# Altium PCB PCB_Lora(long-range)-board_2026-11-07.pcbdoc (part 2 of 2)
Units mil, origin at the board's own origin, x right, y up, seen from the top; angles counter-clockwise.
Board outline 3860 x 3395 mil, 2 copper layers (Top Layer, Bottom Layer); 64 components, 85 nets, 224 pads, 399 vias.
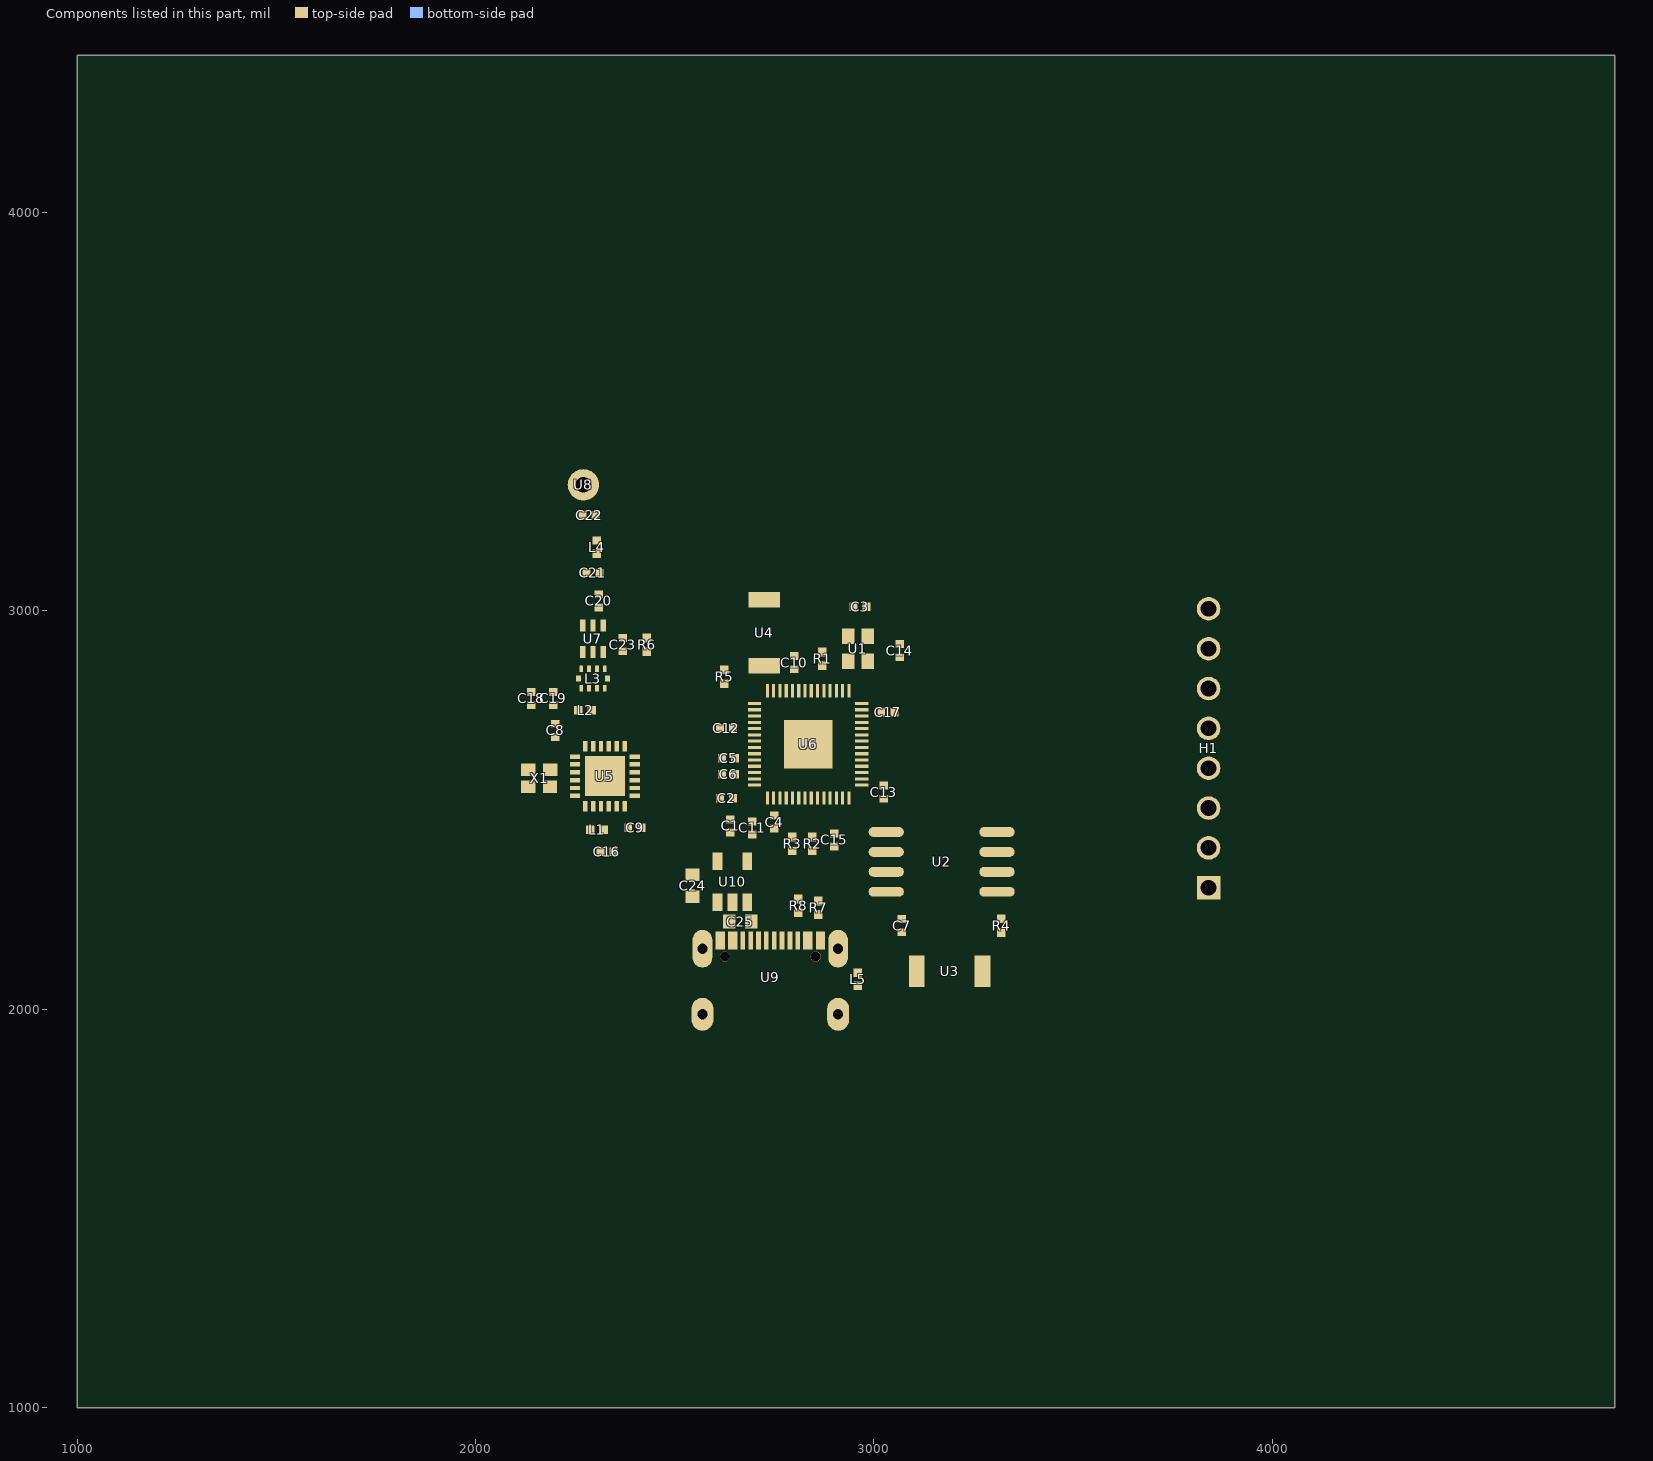
[diagram p2: the components of this part, seen from the top]

## Polygon pours and split planes (outlines as drawn) (continued)
VCC on Internal Plane 2 (split plane): 96 vertices, not listed, extent 2351.72,2801.71 2388.29,2838.29
VCC on Internal Plane 2 (split plane): 350 vertices, not listed, extent 2126.72,2811.71 2248.29,2878.29
VCC on Internal Plane 2 (split plane): 96 vertices, not listed, extent 2081.72,2821.71 2118.29,2858.29
VCC on Internal Plane 2 (split plane): 96 vertices, not listed, extent 3671.72,2826.71 3708.29,2863.29
VCC on Internal Plane 2 (split plane): 96 vertices, not listed, extent 2401.72,2826.71 2438.29,2863.29
VCC on Internal Plane 2 (split plane): 96 vertices, not listed, extent 1961.72,2831.71 1998.29,2868.29
VCC on Internal Plane 2 (split plane): 96 vertices, not listed, extent 3541.72,2846.71 3578.29,2883.29
VCC on Internal Plane 2 (split plane): 96 vertices, not listed, extent 3436.72,2856.71 3473.29,2893.29
VCC on Internal Plane 2 (split plane): 96 vertices, not listed, extent 2471.72,2866.71 2508.29,2903.29
VCC on Internal Plane 2 (split plane): 133 vertices, not listed, extent 3804.39,2869.39 3875.61,2940.61
VCC on Internal Plane 2 (split plane): 96 vertices, not listed, extent 2216.72,2871.71 2253.29,2908.29
VCC on Internal Plane 2 (split plane): 188 vertices, not listed, extent 2176.72,2876.71 2223.29,2948.29
VCC on Internal Plane 2 (split plane): 96 vertices, not listed, extent 1961.72,2881.71 1998.29,2918.29
VCC on Internal Plane 2 (split plane): 96 vertices, not listed, extent 2746.72,2881.71 2783.29,2918.29
VCC on Internal Plane 2 (split plane): 96 vertices, not listed, extent 3261.72,2886.71 3298.29,2923.29
VCC on Internal Plane 2 (split plane): 96 vertices, not listed, extent 3736.72,2886.71 3773.29,2923.29
VCC on Internal Plane 2 (split plane): 96 vertices, not listed, extent 2596.72,2896.71 2633.29,2933.29
VCC on Internal Plane 2 (split plane): 96 vertices, not listed, extent 2101.72,2906.71 2138.29,2943.29
VCC on Internal Plane 2 (split plane): 96 vertices, not listed, extent 2481.72,2906.71 2518.29,2943.29
VCC on Internal Plane 2 (split plane): 96 vertices, not listed, extent 3601.72,2911.71 3638.29,2948.29
VCC on Internal Plane 2 (split plane): 96 vertices, not listed, extent 2146.72,2911.71 2183.29,2948.29
VCC on Internal Plane 2 (split plane): 96 vertices, not listed, extent 3161.72,2931.71 3198.29,2968.29
VCC on Internal Plane 2 (split plane): 96 vertices, not listed, extent 2531.72,2936.71 2568.29,2973.29
VCC on Internal Plane 2 (split plane): 96 vertices, not listed, extent 2736.72,2941.71 2773.29,2978.29
VCC on Internal Plane 2 (split plane): 96 vertices, not listed, extent 1961.72,2946.71 1998.29,2983.29
VCC on Internal Plane 2 (split plane): 96 vertices, not listed, extent 3396.72,2946.71 3433.29,2983.29
VCC on Internal Plane 2 (split plane): 96 vertices, not listed, extent 2461.72,2946.71 2498.29,2983.29
VCC on Internal Plane 2 (split plane): 96 vertices, not listed, extent 2171.72,2951.71 2208.29,2988.29
VCC on Internal Plane 2 (split plane): 96 vertices, not listed, extent 3286.72,2956.71 3323.29,2993.29
VCC on Internal Plane 2 (split plane): 96 vertices, not listed, extent 3626.72,2956.71 3663.29,2993.29
VCC on Internal Plane 2 (split plane): 96 vertices, not listed, extent 2416.72,2956.71 2453.29,2993.29
VCC on Internal Plane 2 (split plane): 96 vertices, not listed, extent 3021.72,2956.71 3058.29,2993.29
VCC on Internal Plane 2 (split plane): 96 vertices, not listed, extent 2056.72,2961.71 2093.29,2998.29
VCC on Internal Plane 2 (split plane): 96 vertices, not listed, extent 3531.72,2971.71 3568.29,3008.29
VCC on Internal Plane 2 (split plane): 20 vertices, not listed, extent 3854.76,2972.59 3872.41,2990.24
VCC on Internal Plane 2 (split plane): 20 vertices, not listed, extent 3807.59,2972.59 3825.24,2990.24
VCC on Internal Plane 2 (split plane): 96 vertices, not listed, extent 2856.72,2976.71 2893.29,3013.29
VCC on Internal Plane 2 (split plane): 96 vertices, not listed, extent 2226.72,2986.71 2263.29,3023.29
VCC on Internal Plane 2 (split plane): 96 vertices, not listed, extent 2341.72,2986.71 2378.29,3023.29
VCC on Internal Plane 2 (split plane): 96 vertices, not listed, extent 1961.72,2996.71 1998.29,3033.29
VCC on Internal Plane 2 (split plane): 20 vertices, not listed, extent 3854.76,3019.76 3872.41,3037.41
VCC on Internal Plane 2 (split plane): 20 vertices, not listed, extent 3807.59,3019.76 3825.24,3037.41
VCC on Internal Plane 2 (split plane): 96 vertices, not listed, extent 2181.72,3026.71 2218.29,3063.29
VCC on Internal Plane 2 (split plane): 96 vertices, not listed, extent 2221.72,3026.71 2258.29,3063.29
VCC on Internal Plane 2 (split plane): 96 vertices, not listed, extent 3391.72,3036.71 3428.29,3073.29
VCC on Internal Plane 2 (split plane): 96 vertices, not listed, extent 2341.72,3036.71 2378.29,3073.29
VCC on Internal Plane 2 (split plane): 96 vertices, not listed, extent 3156.72,3046.71 3193.29,3083.29
VCC on Internal Plane 2 (split plane): 96 vertices, not listed, extent 3291.72,3046.71 3328.29,3083.29
VCC on Internal Plane 2 (split plane): 96 vertices, not listed, extent 3046.72,3051.71 3083.29,3088.29
VCC on Internal Plane 2 (split plane): 96 vertices, not listed, extent 1961.72,3051.71 1998.29,3088.29
VCC on Internal Plane 2 (split plane): 96 vertices, not listed, extent 2086.72,3056.71 2123.29,3093.29
VCC on Internal Plane 2 (split plane): 96 vertices, not listed, extent 3676.72,3061.71 3713.29,3098.29
VCC on Internal Plane 2 (split plane): 96 vertices, not listed, extent 2776.72,3066.71 2813.29,3103.29
VCC on Internal Plane 2 (split plane): 96 vertices, not listed, extent 2221.72,3076.71 2258.29,3113.29
VCC on Internal Plane 2 (split plane): 96 vertices, not listed, extent 3516.72,3086.71 3553.29,3123.29
VCC on Internal Plane 2 (split plane): 96 vertices, not listed, extent 3826.72,3091.71 3863.29,3128.29
VCC on Internal Plane 2 (split plane): 96 vertices, not listed, extent 2336.72,3091.71 2373.29,3128.29
VCC on Internal Plane 2 (split plane): 96 vertices, not listed, extent 1961.72,3101.71 1998.29,3138.29
VCC on Internal Plane 2 (split plane): 96 vertices, not listed, extent 2041.72,3101.71 2078.29,3138.29
VCC on Internal Plane 2 (split plane): 96 vertices, not listed, extent 2651.72,3101.71 2688.29,3138.29
VCC on Internal Plane 2 (split plane): 96 vertices, not listed, extent 2186.72,3106.71 2223.29,3143.29
VCC on Internal Plane 2 (split plane): 96 vertices, not listed, extent 2781.72,3116.71 2818.29,3153.29
VCC on Internal Plane 2 (split plane): 96 vertices, not listed, extent 2431.72,3131.71 2468.29,3168.29
VCC on Internal Plane 2 (split plane): 96 vertices, not listed, extent 3056.72,3136.71 3093.29,3173.29
VCC on Internal Plane 2 (split plane): 96 vertices, not listed, extent 2336.72,3136.71 2373.29,3173.29
VCC on Internal Plane 2 (split plane): 96 vertices, not listed, extent 2216.72,3141.71 2253.29,3178.29
VCC on Internal Plane 2 (split plane): 96 vertices, not listed, extent 1961.72,3156.71 1998.29,3193.29
VCC on Internal Plane 2 (split plane): 96 vertices, not listed, extent 3831.72,3156.71 3868.29,3193.29
VCC on Internal Plane 2 (split plane): 96 vertices, not listed, extent 2066.72,3161.71 2103.29,3198.29
VCC on Internal Plane 2 (split plane): 96 vertices, not listed, extent 2521.72,3161.71 2558.29,3198.29
VCC on Internal Plane 2 (split plane): 96 vertices, not listed, extent 3186.72,3166.71 3223.29,3203.29
VCC on Internal Plane 2 (split plane): 96 vertices, not listed, extent 3426.72,3166.71 3463.29,3203.29
VCC on Internal Plane 2 (split plane): 96 vertices, not listed, extent 3771.72,3171.71 3808.29,3208.29
VCC on Internal Plane 2 (split plane): 96 vertices, not listed, extent 3296.72,3181.71 3333.29,3218.29
VCC on Internal Plane 2 (split plane): 96 vertices, not listed, extent 2331.72,3181.71 2368.29,3218.29
VCC on Internal Plane 2 (split plane): 96 vertices, not listed, extent 2131.72,3191.71 2168.29,3228.29
VCC on Internal Plane 2 (split plane): 96 vertices, not listed, extent 2211.72,3191.71 2248.29,3228.29
VCC on Internal Plane 2 (split plane): 96 vertices, not listed, extent 2671.72,3196.71 2708.29,3233.29
VCC on Internal Plane 2 (split plane): 96 vertices, not listed, extent 2401.72,3201.71 2438.29,3238.29
VCC on Internal Plane 2 (split plane): 96 vertices, not listed, extent 1961.72,3206.71 1998.29,3243.29
VCC on Internal Plane 2 (split plane): 96 vertices, not listed, extent 2891.72,3211.71 2928.29,3248.29
VCC on Internal Plane 2 (split plane): 188 vertices, not listed, extent 2186.72,3226.71 2233.29,3298.29
VCC on Internal Plane 2 (split plane): 96 vertices, not listed, extent 3601.72,3231.71 3638.29,3268.29
VCC on Internal Plane 2 (split plane): 96 vertices, not listed, extent 3826.72,3236.71 3863.29,3273.29
VCC on Internal Plane 2 (split plane): 96 vertices, not listed, extent 2336.72,3236.71 2373.29,3273.29
VCC on Internal Plane 2 (split plane): 96 vertices, not listed, extent 2591.72,3246.71 2628.29,3283.29
VCC on Internal Plane 2 (split plane): 96 vertices, not listed, extent 1961.72,3251.71 1998.29,3288.29
VCC on Internal Plane 2 (split plane): 96 vertices, not listed, extent 2106.72,3256.71 2143.29,3293.29
VCC on Internal Plane 2 (split plane): 96 vertices, not listed, extent 3096.72,3261.71 3133.29,3298.29
VCC on Internal Plane 2 (split plane): 150 vertices, not listed, extent 2225.47,3270.89 2316.36,3361.79
VCC on Internal Plane 2 (split plane): 96 vertices, not listed, extent 2331.72,3276.71 2368.29,3313.29
VCC on Internal Plane 2 (split plane): 96 vertices, not listed, extent 3826.72,3281.71 3863.29,3318.29
VCC on Internal Plane 2 (split plane): 96 vertices, not listed, extent 2796.72,3286.71 2833.29,3323.29
VCC on Internal Plane 2 (split plane): 96 vertices, not listed, extent 1961.72,3291.71 1998.29,3328.29
VCC on Internal Plane 2 (split plane): 96 vertices, not listed, extent 2061.72,3291.71 2098.29,3328.29
VCC on Internal Plane 2 (split plane): 96 vertices, not listed, extent 3491.72,3296.71 3528.29,3333.29
VCC on Internal Plane 2 (split plane): 96 vertices, not listed, extent 2466.72,3301.71 2503.29,3338.29
VCC on Internal Plane 2 (split plane): 96 vertices, not listed, extent 2186.72,3311.71 2223.29,3348.29
VCC on Internal Plane 2 (split plane): 96 vertices, not listed, extent 2331.72,3316.71 2368.29,3353.29
VCC on Internal Plane 2 (split plane): 96 vertices, not listed, extent 2696.72,3321.71 2733.29,3358.29
VCC on Internal Plane 2 (split plane): 96 vertices, not listed, extent 3826.72,3331.71 3863.29,3368.29
VCC on Internal Plane 2 (split plane): 96 vertices, not listed, extent 3301.72,3331.71 3338.29,3368.29
VCC on Internal Plane 2 (split plane): 96 vertices, not listed, extent 1961.72,3336.71 1998.29,3373.29
VCC on Internal Plane 2 (split plane): 96 vertices, not listed, extent 3671.72,3336.71 3708.29,3373.29
VCC on Internal Plane 2 (split plane): 96 vertices, not listed, extent 3076.72,3341.71 3113.29,3378.29
VCC on Internal Plane 2 (split plane): 96 vertices, not listed, extent 2306.72,3346.71 2343.29,3383.29
VCC on Internal Plane 2 (split plane): 96 vertices, not listed, extent 2211.72,3351.71 2248.29,3388.29
VCC on Internal Plane 2 (split plane): 96 vertices, not listed, extent 2906.72,3356.71 2943.29,3393.29
VCC on Internal Plane 2 (split plane): 96 vertices, not listed, extent 2261.72,3361.71 2298.29,3398.29
VCC on Internal Plane 2 (split plane): 96 vertices, not listed, extent 2076.72,3371.71 2113.29,3408.29
VCC on Internal Plane 2 (split plane): 175 vertices, not listed, extent 1961.72,3381.71 1998.29,3453.29
VCC on Internal Plane 2 (split plane): 96 vertices, not listed, extent 2146.72,3386.71 2183.29,3423.29
VCC on Internal Plane 2 (split plane): 96 vertices, not listed, extent 3826.72,3391.71 3863.29,3428.29
VCC on Internal Plane 2 (split plane): 96 vertices, not listed, extent 2766.72,3401.71 2803.29,3438.29
VCC on Internal Plane 2 (split plane): 96 vertices, not listed, extent 3536.72,3411.71 3573.29,3448.29
VCC on Internal Plane 2 (split plane): 96 vertices, not listed, extent 3376.72,3416.71 3413.29,3453.29
VCC on Internal Plane 2 (split plane): 96 vertices, not listed, extent 2456.72,3426.71 2493.29,3463.29
VCC on Internal Plane 2 (split plane): 96 vertices, not listed, extent 3826.72,3431.71 3863.29,3468.29
VCC on Internal Plane 2 (split plane): 96 vertices, not listed, extent 2251.72,3451.71 2288.29,3488.29
VCC on Internal Plane 2 (split plane): 96 vertices, not listed, extent 2351.72,3451.71 2388.29,3488.29
VCC on Internal Plane 2 (split plane): 96 vertices, not listed, extent 2161.72,3466.71 2198.29,3503.29
VCC on Internal Plane 2 (split plane): 176 vertices, not listed, extent 1966.72,3471.71 2038.29,3508.29
VCC on Internal Plane 2 (split plane): 96 vertices, not listed, extent 2101.72,3471.71 2138.29,3508.29
VCC on Internal Plane 2 (split plane): 96 vertices, not listed, extent 2206.72,3471.71 2243.29,3508.29
VCC on Internal Plane 2 (split plane): 96 vertices, not listed, extent 2306.72,3471.71 2343.29,3508.29
VCC on Internal Plane 2 (split plane): 96 vertices, not listed, extent 2396.72,3471.71 2433.29,3508.29
VCC on Internal Plane 2 (split plane): 96 vertices, not listed, extent 2461.72,3471.71 2498.29,3508.29
VCC on Internal Plane 2 (split plane): 96 vertices, not listed, extent 2531.72,3471.71 2568.29,3508.29
VCC on Internal Plane 2 (split plane): 96 vertices, not listed, extent 2616.72,3471.71 2653.29,3508.29
VCC on Internal Plane 2 (split plane): 96 vertices, not listed, extent 2691.72,3471.71 2728.29,3508.29
VCC on Internal Plane 2 (split plane): 96 vertices, not listed, extent 2771.72,3471.71 2808.29,3508.29
VCC on Internal Plane 2 (split plane): 96 vertices, not listed, extent 2871.72,3471.71 2908.29,3508.29
VCC on Internal Plane 2 (split plane): 96 vertices, not listed, extent 2926.72,3471.71 2963.29,3508.29
VCC on Internal Plane 2 (split plane): 96 vertices, not listed, extent 2981.72,3471.71 3018.29,3508.29
VCC on Internal Plane 2 (split plane): 96 vertices, not listed, extent 3046.72,3471.71 3083.29,3508.29
VCC on Internal Plane 2 (split plane): 96 vertices, not listed, extent 3106.72,3471.71 3143.29,3508.29
VCC on Internal Plane 2 (split plane): 96 vertices, not listed, extent 3166.72,3471.71 3203.29,3508.29
VCC on Internal Plane 2 (split plane): 96 vertices, not listed, extent 3216.72,3471.71 3253.29,3508.29
VCC on Internal Plane 2 (split plane): 96 vertices, not listed, extent 3271.72,3471.71 3308.29,3508.29
VCC on Internal Plane 2 (split plane): 96 vertices, not listed, extent 3321.72,3471.71 3358.29,3508.29
VCC on Internal Plane 2 (split plane): 96 vertices, not listed, extent 3381.72,3471.71 3418.29,3508.29
VCC on Internal Plane 2 (split plane): 96 vertices, not listed, extent 3436.72,3471.71 3473.29,3508.29
VCC on Internal Plane 2 (split plane): 96 vertices, not listed, extent 3496.72,3471.71 3533.29,3508.29
VCC on Internal Plane 2 (split plane): 96 vertices, not listed, extent 3536.72,3471.71 3573.29,3508.29
VCC on Internal Plane 2 (split plane): 96 vertices, not listed, extent 3586.72,3471.71 3623.29,3508.29
VCC on Internal Plane 2 (split plane): 96 vertices, not listed, extent 3631.72,3471.71 3668.29,3508.29
VCC on Internal Plane 2 (split plane): 96 vertices, not listed, extent 3691.72,3471.71 3728.29,3508.29
VCC on Internal Plane 2 (split plane): 96 vertices, not listed, extent 3741.72,3471.71 3778.29,3508.29
VCC on Internal Plane 2 (split plane): 96 vertices, not listed, extent 3786.72,3471.71 3823.29,3508.29
VCC on Internal Plane 2 (split plane): 96 vertices, not listed, extent 3826.72,3471.71 3863.29,3508.29
VCC on Internal Plane 2 (split plane): 96 vertices, not listed, extent 2046.72,3471.71 2083.29,3508.29
GND on Internal Plane 1 (split plane): 1945,1870 1945,3525 3905,3525 3905,1870
GND on Internal Plane 1 (split plane): 257 vertices, not listed, extent 2536.18,1940.06 2603.26,2034.68
GND on Internal Plane 1 (split plane): 257 vertices, not listed, extent 2876.74,1940.06 2943.82,2034.68
GND on Internal Plane 1 (split plane): 169 vertices, not listed, extent 2721.72,2061.71 2773.29,2128.29
GND on Internal Plane 1 (split plane): 257 vertices, not listed, extent 2539.13,2098.73 2600.31,2205.17
GND on Internal Plane 1 (split plane): 257 vertices, not listed, extent 2879.69,2098.73 2940.87,2205.17
GND on Internal Plane 1 (split plane): 96 vertices, not listed, extent 2671.72,2101.71 2708.29,2138.29
GND on Internal Plane 1 (split plane): 96 vertices, not listed, extent 2781.72,2106.71 2818.29,2143.29
GND on Internal Plane 1 (split plane): 97 vertices, not listed, extent 2607.34,2113.39 2645.1,2151.15
GND on Internal Plane 1 (split plane): 97 vertices, not listed, extent 2834.9,2113.39 2872.66,2151.15
GND on Internal Plane 1 (split plane): 96 vertices, not listed, extent 2816.72,2196.71 2853.29,2233.29
GND on Internal Plane 1 (split plane): 96 vertices, not listed, extent 2706.72,2201.71 2743.29,2238.29
GND on Internal Plane 1 (split plane): 96 vertices, not listed, extent 2996.72,2211.71 3033.29,2248.29
GND on Internal Plane 1 (split plane): 96 vertices, not listed, extent 2896.72,2241.71 2933.29,2278.29
GND on Internal Plane 1 (split plane): 121 vertices, not listed, extent 3804.49,2269.49 3875.51,2340.51
GND on Internal Plane 1 (split plane): 96 vertices, not listed, extent 3181.72,2276.71 3218.29,2313.29
GND on Internal Plane 1 (split plane): 162 vertices, not listed, extent 3081.72,2296.71 3138.29,2358.29
GND on Internal Plane 1 (split plane): 96 vertices, not listed, extent 2626.72,2356.71 2663.29,2393.29
GND on Internal Plane 1 (split plane): 133 vertices, not listed, extent 3804.39,2369.39 3875.61,2440.61
GND on Internal Plane 1 (split plane): 96 vertices, not listed, extent 2951.72,2376.71 2988.29,2413.29
GND on Internal Plane 1 (split plane): 96 vertices, not listed, extent 3131.72,2426.71 3168.29,2463.29
GND on Internal Plane 1 (split plane): 96 vertices, not listed, extent 2926.72,2461.71 2963.29,2498.29
GND on Internal Plane 1 (split plane): 96 vertices, not listed, extent 2321.72,2461.71 2358.29,2498.29
GND on Internal Plane 1 (split plane): 133 vertices, not listed, extent 3804.39,2469.39 3875.61,2540.61
GND on Internal Plane 1 (split plane): 168 vertices, not listed, extent 2656.72,2486.71 2723.29,2538.29
GND on Internal Plane 1 (split plane): 96 vertices, not listed, extent 2381.72,2486.71 2418.29,2523.29
GND on Internal Plane 1 (split plane): 96 vertices, not listed, extent 2426.72,2486.71 2463.29,2523.29
GND on Internal Plane 1 (split plane): 96 vertices, not listed, extent 2941.72,2511.71 2978.29,2548.29
GND on Internal Plane 1 (split plane): 96 vertices, not listed, extent 2516.72,2531.71 2553.29,2568.29
GND on Internal Plane 1 (split plane): 96 vertices, not listed, extent 3126.72,2541.71 3163.29,2578.29
GND on Internal Plane 1 (split plane): 96 vertices, not listed, extent 2566.72,2541.71 2603.29,2578.29
GND on Internal Plane 1 (split plane): 96 vertices, not listed, extent 2906.72,2556.71 2943.29,2593.29
GND on Internal Plane 1 (split plane): 177 vertices, not listed, extent 2731.72,2556.71 2773.29,2628.29
GND on Internal Plane 1 (split plane): 96 vertices, not listed, extent 2866.72,2561.71 2903.29,2598.29
GND on Internal Plane 1 (split plane): 96 vertices, not listed, extent 2821.72,2566.71 2858.29,2603.29
GND on Internal Plane 1 (split plane): 96 vertices, not listed, extent 3441.72,2566.71 3478.29,2603.29
GND on Internal Plane 1 (split plane): 133 vertices, not listed, extent 3804.39,2569.39 3875.61,2640.61
GND on Internal Plane 1 (split plane): 96 vertices, not listed, extent 2896.72,2611.71 2933.29,2648.29
GND on Internal Plane 1 (split plane): 96 vertices, not listed, extent 2191.72,2626.71 2228.29,2663.29
GND on Internal Plane 1 (split plane): 96 vertices, not listed, extent 2611.72,2646.71 2648.29,2683.29
GND on Internal Plane 1 (split plane): 133 vertices, not listed, extent 3804.39,2669.39 3875.61,2740.61
GND on Internal Plane 1 (split plane): 96 vertices, not listed, extent 2716.72,2676.71 2753.29,2713.29
GND on Internal Plane 1 (split plane): 96 vertices, not listed, extent 2416.72,2691.71 2453.29,2728.29
GND on Internal Plane 1 (split plane): 177 vertices, not listed, extent 2731.72,2731.71 2803.29,2773.29
GND on Internal Plane 1 (split plane): 96 vertices, not listed, extent 2811.72,2736.71 2848.29,2773.29
GND on Internal Plane 1 (split plane): 133 vertices, not listed, extent 3804.39,2769.39 3875.61,2840.61
GND on Internal Plane 1 (split plane): 96 vertices, not listed, extent 3001.72,2776.71 3038.29,2813.29
GND on Internal Plane 1 (split plane): 96 vertices, not listed, extent 2461.72,2786.71 2498.29,2823.29
GND on Internal Plane 1 (split plane): 96 vertices, not listed, extent 2401.72,2826.71 2438.29,2863.29
GND on Internal Plane 1 (split plane): 96 vertices, not listed, extent 2551.72,2836.71 2588.29,2873.29
GND on Internal Plane 1 (split plane): 20 vertices, not listed, extent 3854.76,2872.59 3872.41,2890.24
GND on Internal Plane 1 (split plane): 20 vertices, not listed, extent 3807.59,2872.59 3825.24,2890.24
GND on Internal Plane 1 (split plane): 20 vertices, not listed, extent 3854.76,2919.76 3872.41,2937.41
GND on Internal Plane 1 (split plane): 20 vertices, not listed, extent 3807.59,2919.76 3825.24,2937.41
GND on Internal Plane 1 (split plane): 96 vertices, not listed, extent 2211.72,2946.71 2248.29,2983.29
GND on Internal Plane 1 (split plane): 133 vertices, not listed, extent 3804.39,2969.39 3875.61,3040.61
GND on Internal Plane 1 (split plane): 96 vertices, not listed, extent 3706.72,2971.71 3743.29,3008.29
GND on Internal Plane 1 (split plane): 150 vertices, not listed, extent 2225.47,3270.89 2316.36,3361.79

## Silkscreen, mask and mechanical layers (free items; w line width, h text height)
Top Overlay:
  text "Lora Board" at 2570,3345.63 h78.74
  text "-by Ayush" at 2965,3255.47 h59.05
  text "VCC" at 3665,2945.32 h39.37
  text "GND" at 3665,2865.32 h39.37
  text "7" at 3725,2799.68 h39.37 r180
  text "6" at 3723.28,2694.61 h39.37 r185
  text "5" at 3730,2604.68 h39.37 r180
  text "4" at 3741.57,2500.93 h39.37 r144
  text "3" at 3735,2404.68 h39.37 r180
  text "2" at 3735,2309.68 h39.37 r180
Bottom Overlay:
  text "Team TCA" at 3680,1890.32 h39.37